# Altium PCB ESP32-Realy-Switch-var-1.PcbDoc (part 2 of 2)
Units mm, origin at the board's own origin, x right, y up, seen from the top; angles counter-clockwise.
Board outline 120 x 84.82 mm, 2 copper layers (Top Layer, Bottom Layer), stack 1.571 mm thick; 116 components, 78 nets, 409 pads, 288 vias.
Unrouted connection lines stored in the file: 1.
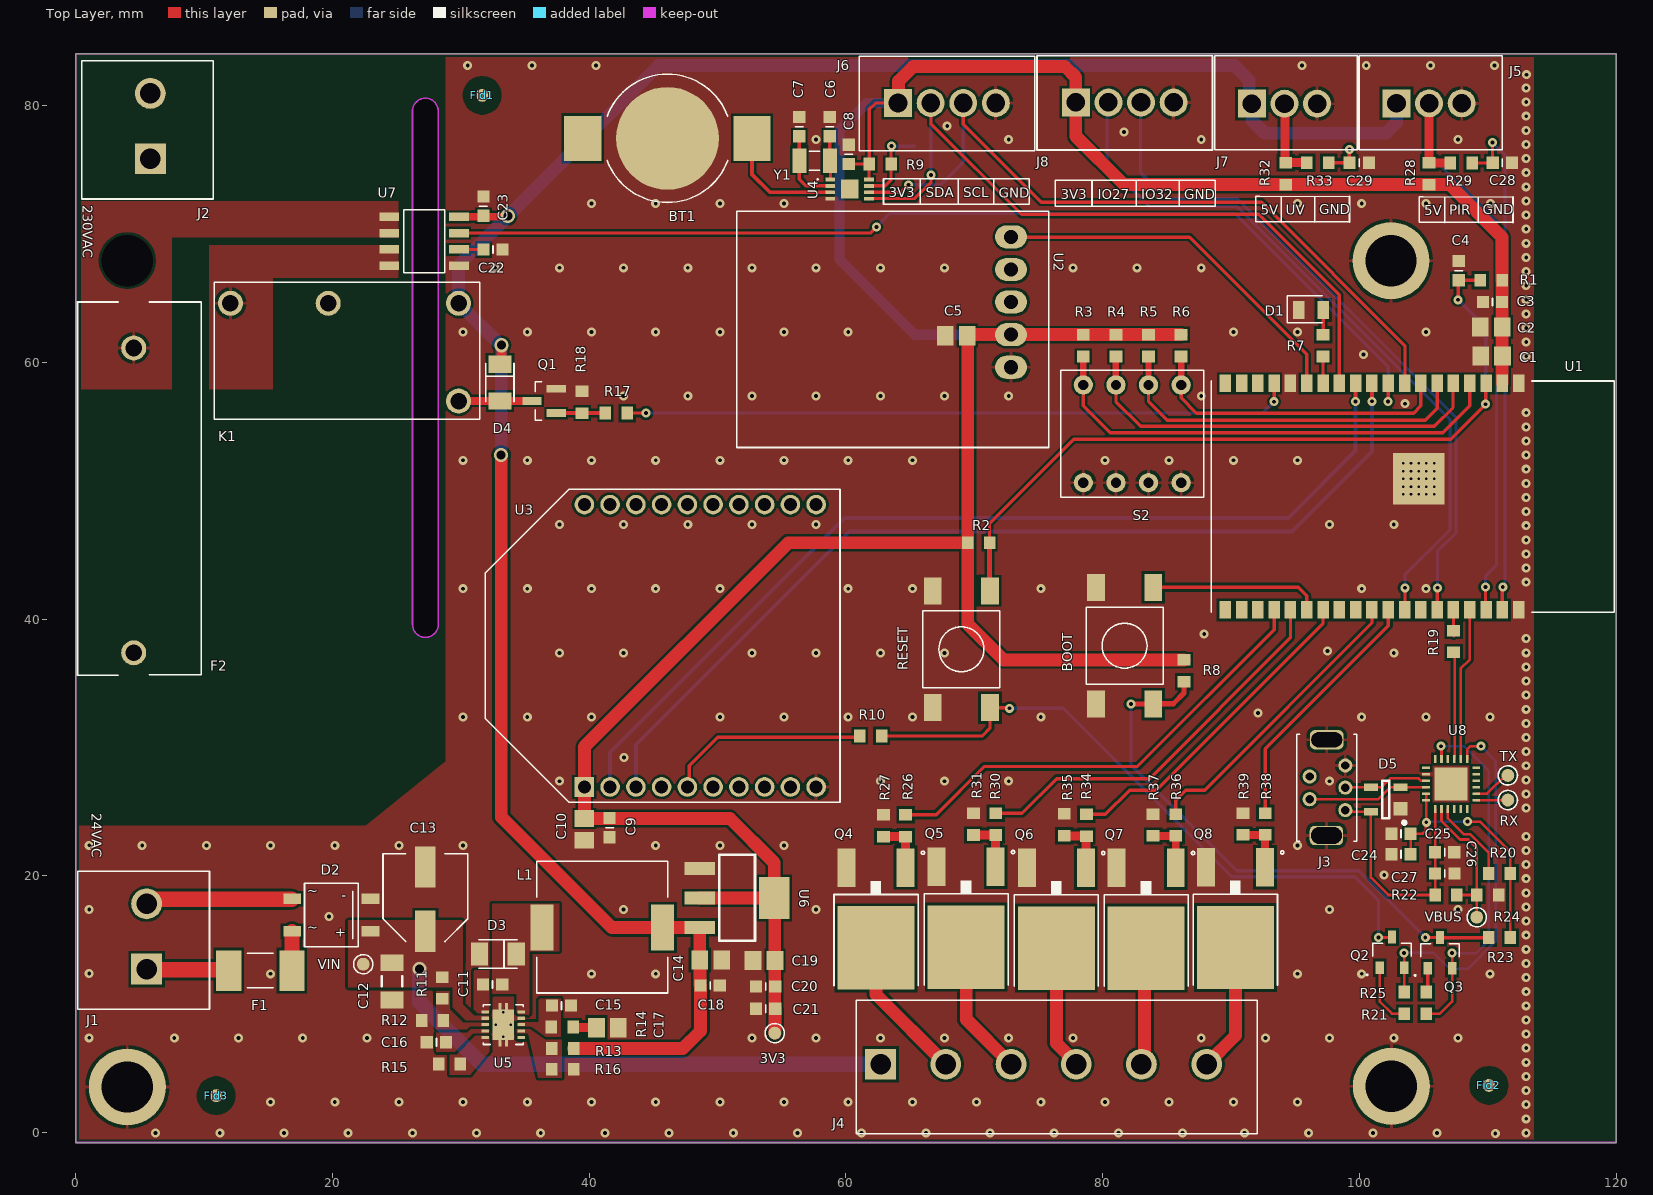
[diagram p0: Top Layer view]

## Via types
v1: diameter 0.7, hole 0.3, Top Layer to Bottom Layer, tented both sides, 283 vias
v2: diameter 1.1, hole 0.7, Top Layer to Bottom Layer, tented both sides, 4 vias
v3: diameter 0.7, hole 0.3, Top Layer to Bottom Layer, 1 vias

## Nets (pads, with @x,y where several pads share a name; then routed paths per layer and width w, separated by ;. In a path a pad name is that pad's centre, name@x,y a point inside that pad or via, vN(x,y) a via of type N, cw(c..) or ccw(c..) an arc to the next point about the centre after c; other vN are vias at no path point) (continued)
NetC22_2: (continued)
  Top Layer w0.254: U7.6 C22.2@31.762,68.799 ; C22.2@31.762,68.799 C22.2
NetD1_2: D1.2 R7.2 | length 1.9
  Top Layer w0.245: R7.2 97.188,62.171 D1.2
NetD2_2: D2.2 J1.2 | length 10.9
  Top Layer w1.2: J1.2@5.892,18.182 D2.2@16.842,18.182
NetD2_4: D2.4 F1.2 | length 3
  Top Layer w1.2: F1.2@16.859,12.633 D2.4@16.859,15.659
NetD4_1: D4.1 K1.4 Q1.2 | length 11.4
  Top Layer w0.6: K1.4@29.852,56.997 Q1.2 K1.4@29.852,56.997
NetF1_1: F1.1 J1.1 | length 6.3
  Top Layer w1.2: J1.1@5.586,12.677 F1.1@11.873,12.677
NetF2_1: F2.1 J2.1
NetF2_2: F2.2 U7.1 U7.2
NetJ5_2: J5.2 R28.1 R29.1 | length 6.3
  Top Layer w0.7: J5.2@105.435,80.175 R28.1 105.447,75.538 107.075,75.538 R29.1
NetJ7_2: J7.2 R32.1 R33.1 | length 6.3
  Top Layer w0.7: J7.2 94.22,80.1 94.22,75.602 R32.1 R33.1
NetQ1_1: Q1.1 R17.1 R18.2 | length 3.8
  Top Layer w0.3: Q1.1 R18.2@39.45,56.047 ; R18.2 R17.1
NetQ2_1: Q2.1 R21.2 | length 4.9
  Top Layer w0.2: Q2.1 101.593,10.209 102.543,9.259 R21.2
NetQ3_1: Q3.1 R25.2 | length 1.9
  Top Layer w0.254: R25.2 105.332,11.055 Q3.1
NetQ4_1: Q4.1 R26.2 R27.2 | length 4.1
  Top Layer w0.7: R27.2 R26.2 Q4.1
NetQ5_1: Q5.1 R30.2 R31.2 | length 4.2
  Top Layer w0.7: R31.2 R30.2 Q5.1
NetQ6_1: Q6.1 R34.2 R35.2 | length 4.2
  Top Layer w0.7: R35.2@77.026,23.112 78.726,23.112 R34.2 78.719,23.08 78.719,20.634 Q6.1
NetQ7_1: Q7.1 R36.2 R37.2 | length 4.3
  Top Layer w0.6: R37.2 R36.2 Q7.1
NetQ8_1: Q8.1 R38.2 R39.2 | length 4.3
  Top Layer w0.6: R39.2 R38.2 92.65,23.165 Q8.1
NetR10_1: R10.1 U3.5 | length 16
  Top Layer w0.254: U3.5 47.796,27.063 47.796,28.583 50.013,30.8 R10.1@61.125,30.8
NetR11_1: R11.1 R12.2 U5.3
NetR13_1: R13.1 R16.2 U5.7
NetR15_2: R15.2 U5.5
NetR19_1: R19.1 U8.21 | length 8.4
  Top Layer w0.2: R19.1 107.429,37.314 107.429,29.332 107.4,29.303 U8.21
NetR20_2: R20.2 U8.9 | length 6.6
  Top Layer w0.2: U8.9 106.9,24.471 108.139,23.232 108.647,23.232 110.07,21.809 R20.2
NetRX_1: RX.1 U8.13 | length 2.5
  Top Layer w0.2: U8.13 RX.1
NetTX_1: TX.1 U8.14 | length 3.1
  Top Layer w0.2: U8.14 109.954,26.403 111.375,27.825 TX.1@111.571,27.825
PIR: C28.2 R29.2 U1.37 | length 40.1
  Top Layer w0.254: R29.2 110.373,75.527 C28.2 110.375,75.571 v1(110.375,77.125) ; U1.37 111.145,42.458 v1(111.179,42.493)
  Bottom Layer w0.254: v1(110.375,77.125) 111.356,76.144 111.356,42.79 111.179,42.613 v1(111.179,42.493)
REL-IN: K1.3 U7.3 U7.4
REL-OUT: J2.2 K1.2
RELAY: R17.2 U1.16 | length 52.2
  Top Layer w0.254: R17.2@42.973,56.058 v1(44.437,56.058) ; v1(93.365,56.934) U1.16
  Bottom Layer w0.254: v1(44.437,56.058) 92.489,56.058 v1(93.365,56.934)
RTS: Q2.2 R25.1 U8.19 | length 29.1
  Top Layer w0.2: v1(103.493,14) 103.516,13.976 Q2.2@103.516,12.859 ; R25.1 Q2.2@103.515,12.813 ; U8.19 108.4,29.851 108.647,30.098 v1(109.474,30.098)
  Bottom Layer w0.2: v1(103.493,14) 105.8,14 107.05,12.75 108.45,12.75 110.619,14.919 110.619,28.952 v1(109.474,30.098)
RXD0: R19.2 U1.34 | length 2
  Top Layer w0.254: U1.34 107.335,38.722 R19.2@107.357,38.7
RXD1: U1.11 U3.2 | length 75.8
  Top Layer w0.3: v1(99.715,56.945) U1.11
  Bottom Layer w0.3: U3.2 41.637,29.612 59.9,47.875 94.469,47.875 99.715,53.121 v1(99.715,56.945)
SW0: R6.1 S2.5 U1.7 | length 24.4
  Top Layer w0.254: S2.5 86.12,57.228 87.311,56.037 104.227,56.037 104.795,56.605 U1.7
  Top Layer w0.5: S2.5 R6.1
SW1: R5.1 S2.6 U1.6 | length 28.9
  Top Layer w0.254: S2.6 83.58,56.945 85.025,55.5 105.13,55.5 106.065,56.435 U1.6
  Top Layer w0.5: S2.6 R5.1
SW2: R4.1 S2.7 U1.5 | length 33.1
  Top Layer w0.254: S2.7 81.04,56.945 82.971,55.014 105.836,55.014 107.298,56.476 107.298,58.333 U1.5
  Top Layer w0.5: S2.7 R4.1
SW3: R3.1 S2.8 U1.4 | length 37.5
  Top Layer w0.254: S2.8 78.5,56.609 80.601,54.507 106.507,54.507 108.605,56.605 U1.4
  Top Layer w0.5: S2.8 R3.1
TR1: R26.1 U1.23 | length 36.2
  Top Layer w0.254: R26.1 67.034,24.759 70.8,28.525 82.721,28.525 93.365,39.169 U1.23
TR2: R30.1 U1.24 | length 30.8
  Top Layer w0.254: R30.1 73.722,24.881 76.413,27.572 83.66,27.572 94.635,38.546 U1.24
TR3: R34.1 U1.26 | length 25.6
  Top Layer w0.254: R34.1 80.225,24.799 82.1,26.673 84.166,26.673 97.175,39.682 U1.26
TR4: R36.1 U1.29 | length 23.1
  Top Layer w0.254: R36.1 85.7,25.901 86.472,26.673 87.964,26.673 100.985,39.695 U1.29
TR5: R38.1 U1.30 | length 19.8
  Top Layer w0.254: R38.1 92.673,29.887 102.255,39.469 U1.30
TXD0: U1.35 U8.20 | length 11.9
  Top Layer w0.2: U8.20 107.9,36.145 108.605,36.85 U1.35
TXD1: U1.10 U3.3 | length 75.4
  Top Layer w0.3: v1(100.985,56.965) U1.10
  Bottom Layer w0.3: U3.3 43.643,30.209 60.27,46.836 94.751,46.836 100.985,53.07 v1(100.985,56.965)
UV: C29.2 R33.2 U1.36 | length 47.1
  Top Layer w0.254: R33.2 C29.2 99.225,75.572 v1(99.225,76.58) ; v1(109.834,42.493) 109.834,40.761 U1.36
  Bottom Layer w0.254: v1(99.225,76.58) 105.063,76.58 110.694,70.95 110.694,44.224 109.834,43.365 v1(109.834,42.493)
V_IN: C12.2 C13.1 D2.1 J4.1 R11.2 U5.2 VIN.1 | length 40.5
  Bottom Layer w1.2: v2@26.799,12.745 26.799,10.153 31.628,5.325 J4.1
  other v2: 26.8,12.75
VBUS: R22.1 R24.2 U8.8 VBUS.1 | length 11.5
  Top Layer w0.2: U8.8@106.4,24.995 106.4,24.274 107.842,22.832 108.471,22.832 109.147,22.156 R24.2 ; U8.8@106.4,25.016 U8.8 ; R22.1 109.133,18.504 R24.2 ; VBUS.1 109.15,18.515 R24.2
VCC-5V: C26.2 C27.2 D5.4 J3.1 R22.2 U8.7 | length 19.5
  Top Layer w0.2: J3.1 99.047,24.983 D5.4 100.904,19.864 102.264,18.504 R22.2 105.908,20.183 C27.2 105.905,21.756 105.93,21.781 105.9,21.811 U8.7
VDD_3V3: 3V3-O.1 C24.2 C25.2 R20.1 R23.2 U8.5 U8.6 | length 20
  Top Layer w0.2: C24.2 C25.2 104.94,23.283 105.18,23.523 105.18,24.136 v1(105.216,24.173) 105.216,26.403 U8.5 ; v1(108.418,24.223) 109.403,24.223 111.77,21.855 R20.1 R23.2
  Bottom Layer w0.2: v1(105.216,24.173) 105.241,24.198 108.393,24.198 v1(108.418,24.223)
pads on no net: Fid1.F1 Fid2.F1 Fid3.F1 J3.4 U1.17 U1.18 U1.19 U1.20 U1.21 U1.22 U1.27 U1.28 U1.32 U2.2 U2.3 U3.4 U3.6 U3.7 U3.8 U3.9 U3.11 U3.12 U3.13 U3.14 U3.15 U3.16 U3.17 U3.18 U3.19 U3.20 U4.0 U5.6 U5.11@33.057,6.876 U5.11@33.057,9.936 U5.11@33.307,7.776 U5.11@33.307,9.036 U5.11@33.557,6.876 U5.11@33.557,9.936 U8.1 U8.10 U8.11 U8.12 U8.15 U8.16 U8.17 U8.18 U8.22 U8.24

## Polygon pours and split planes (outlines as drawn)
GND on Top Layer "GND_L01_P064" (solid, remove dead copper, pour order 64): 0.025,-0.565 0.025,23.9 22.6,23.9 28.818,28.925 28.818,84.05 113.6,84.05 113.6,-0.764
NetF2_2 on Top Layer "NETF2_2_L01_P069" (solid, pour order 69): 25.15,72.55 25.15,69.75 7.475,69.75 7.475,57.9 0.425,57.9 0.425,72.55
REL-IN on Top Layer "REL-IN_L01_P067" (solid, pour order 67): 25.15,69.124 25.15,66.578 15.35,66.578 15.35,57.9 10.4,57.9 10.4,69.124
NetC11_2 on Top Layer "NETC11_2_L01_P051" (solid, remove dead copper, pour order 51): 32.456,17.819 32.456,10.822 34.355,10.822 34.355,9.138 35.351,9.138 35.351,14.133 37.666,14.133 37.666,17.819
NetC15_2 on Top Layer "NETC15_2_L01_P050" (solid, remove dead copper, pour order 50): 34.463,8.207 34.463,8.618 36.088,8.609 36.088,10.426 37.793,10.426 37.793,7.378 36.538,7.378 35.338,8.207
NetR13_1 on Top Layer "NETR13_1_L01_P049" (solid, remove dead copper, pour order 49): 34.355,8.063 34.355,7.731 35.24,7.731 36.055,4.261 37.859,4.261 37.859,7.243 36.567,7.243 35.427,8.063
NetR11_1 on Top Layer "NETR11_1_L01_P047" (solid, remove dead copper, pour order 47): 32.239,8.206 32.239,8.56 30.205,8.56 29.155,9.61 29.155,10.991 28.109,10.991 28.109,8.063 30.603,8.063 30.747,8.206
NetC16_2 on Top Layer "NETC16_2_L01_P046" (solid, remove dead copper, pour order 46): 32.239,7.731 32.239,8.063 30.779,8.063 30.51,7.794 28.109,7.794 28.109,6.278 29.527,6.278 30.98,7.731
V_IN on Top Layer "V_IN_L01_P044" (solid, remove dead copper, pour order 44): 32.23,8.742 32.23,9.086 31.05,9.086 30.156,9.98 30.169,16.525 22.724,16.525 21.225,16.525 21.225,11.302 29.37,11.302 29.37,9.776 30.404,8.742
NetC11_1 on Top Layer "NETC11_1_L01_P048" (solid, remove dead copper, pour order 48): 32.239,9.249 31.354,9.249 31.008,9.595 31.008,12.643 32.239,12.643
NetR15_2 on Top Layer "NETR15_2_L01_P045" (solid, remove dead copper, pour order 45): 29.155,6.08 29.155,4.506 30.739,4.506 32.239,6.305 32.239,7.542 31.141,7.542 29.678,6.08
GND on Bottom Layer "GND_L02_P065" (solid, remove dead copper, pour order 65): -0.045,-0.565 -0.045,23.9 22.575,23.9 28.815,28.918 28.815,84.012 113.53,84.012 113.53,-0.764
NetF2_1 on Bottom Layer "NETF2_1_L02_P070" (solid, pour order 70): 1.3,35.75 9.725,35.75 9.725,67.65 9.725,77.475 0.85,77.475 0.85,70.194 7.119,70.194 7.042,49.975 1.3,49.975
REL-OUT on Bottom Layer "REL-OUT_L02_P068" (solid, pour order 68): 20.8,83.562 0.512,83.562 0.408,78.701 14.875,78.701 14.875,62.325 20.8,62.325

## Keep-outs
Keep-Out Layer:
  lines w0.127: 0,-0.775 0,84.05 120.025,84.05 120.025,-0.775 0,-0.775 ; 26.238,39.6 ccw(c27.244,39.58) 28.25,39.6 28.25,79.6 ccw(c27.244,79.569) 26.238,79.6 26.238,39.6

## Silkscreen, mask and mechanical layers (free items; w line width, h text height)
Top Overlay:
  lines w0.127: 65.788,72.326 65.788,74.315 ; 68.752,72.358 68.752,74.274 ; 71.531,72.308 71.531,74.305 ; 79.175,72.183 79.175,74.172 ; 82.617,72.262 82.617,74.178 ; 85.974,72.154 85.974,74.151 ; 93.93,70.913 93.93,72.902 ; 96.535,70.935 96.535,72.851 ; 99.219,70.943 91.932,70.943 91.932,72.943 92.238,72.943 99.232,72.906 ; 99.239,70.924 99.239,72.921 ; 106.66,70.876 106.66,72.865 ; 109.265,70.898 109.265,72.814 ; 111.949,70.906 104.662,70.906 104.662,72.906 104.968,72.906 111.962,72.87 ; 111.969,70.888 111.969,72.885 ; 62.933,72.317 74.276,72.317 74.276,74.317 63.239,74.317 62.933,74.317 62.933,72.317 ; 76.32,72.174 76.32,74.174 76.627,74.174 88.764,74.174 88.764,72.174 76.32,72.174
  text "3V3" at 63.342,72.863 h0.76
  text "SDA" at 66.219,72.854 h0.76
  text "SCL" at 69.155,72.847 h0.76
  text "GND" at 71.906,72.83 h0.76
  text "3V3" at 76.73,72.72 h0.76
  text "IO27" at 79.607,72.711 h0.76
  text "IO32" at 82.999,72.711 h0.76
  text "GND" at 86.351,72.711 h0.76
  text "230VAC" at 0.55,72.225 h0.76 r270
  text "GND" at 96.893,71.557 h0.76
  text "UV" at 94.27,71.517 h0.76
  text "GND" at 109.623,71.52 h0.76
  text "5V" at 92.341,71.489 h0.76
  text "PIR" at 107,71.48 h0.76
  text "5V" at 105.071,71.452 h0.76
  text "24VAC" at 1.275,24.875 h0.76 r270

## Text inside footprints (layer, text, board x,y; h text height)
D2: Top Overlay "~" at 18.909,19.104 h0.76 r180; Top Overlay "~" at 18.909,16.285 h0.76 r180; Top Overlay "-" at 21.093,18.672 h0.76 r180; Top Overlay "+" at 21.093,15.878 h0.76 r180